# Altium PCB Urukul.PcbDoc (part 2 of 15)
Units mm, origin at the board's own origin, x right, y up, seen from the top; angles counter-clockwise.
Board outline 161.99 x 100 mm, 6 copper layers (L1, L2, L3, L4, P5, L6), stack 1.548 mm thick; 1078 components, 609 nets, 3798 pads, 2552 vias.
Unrouted connection lines stored in the file: 1.
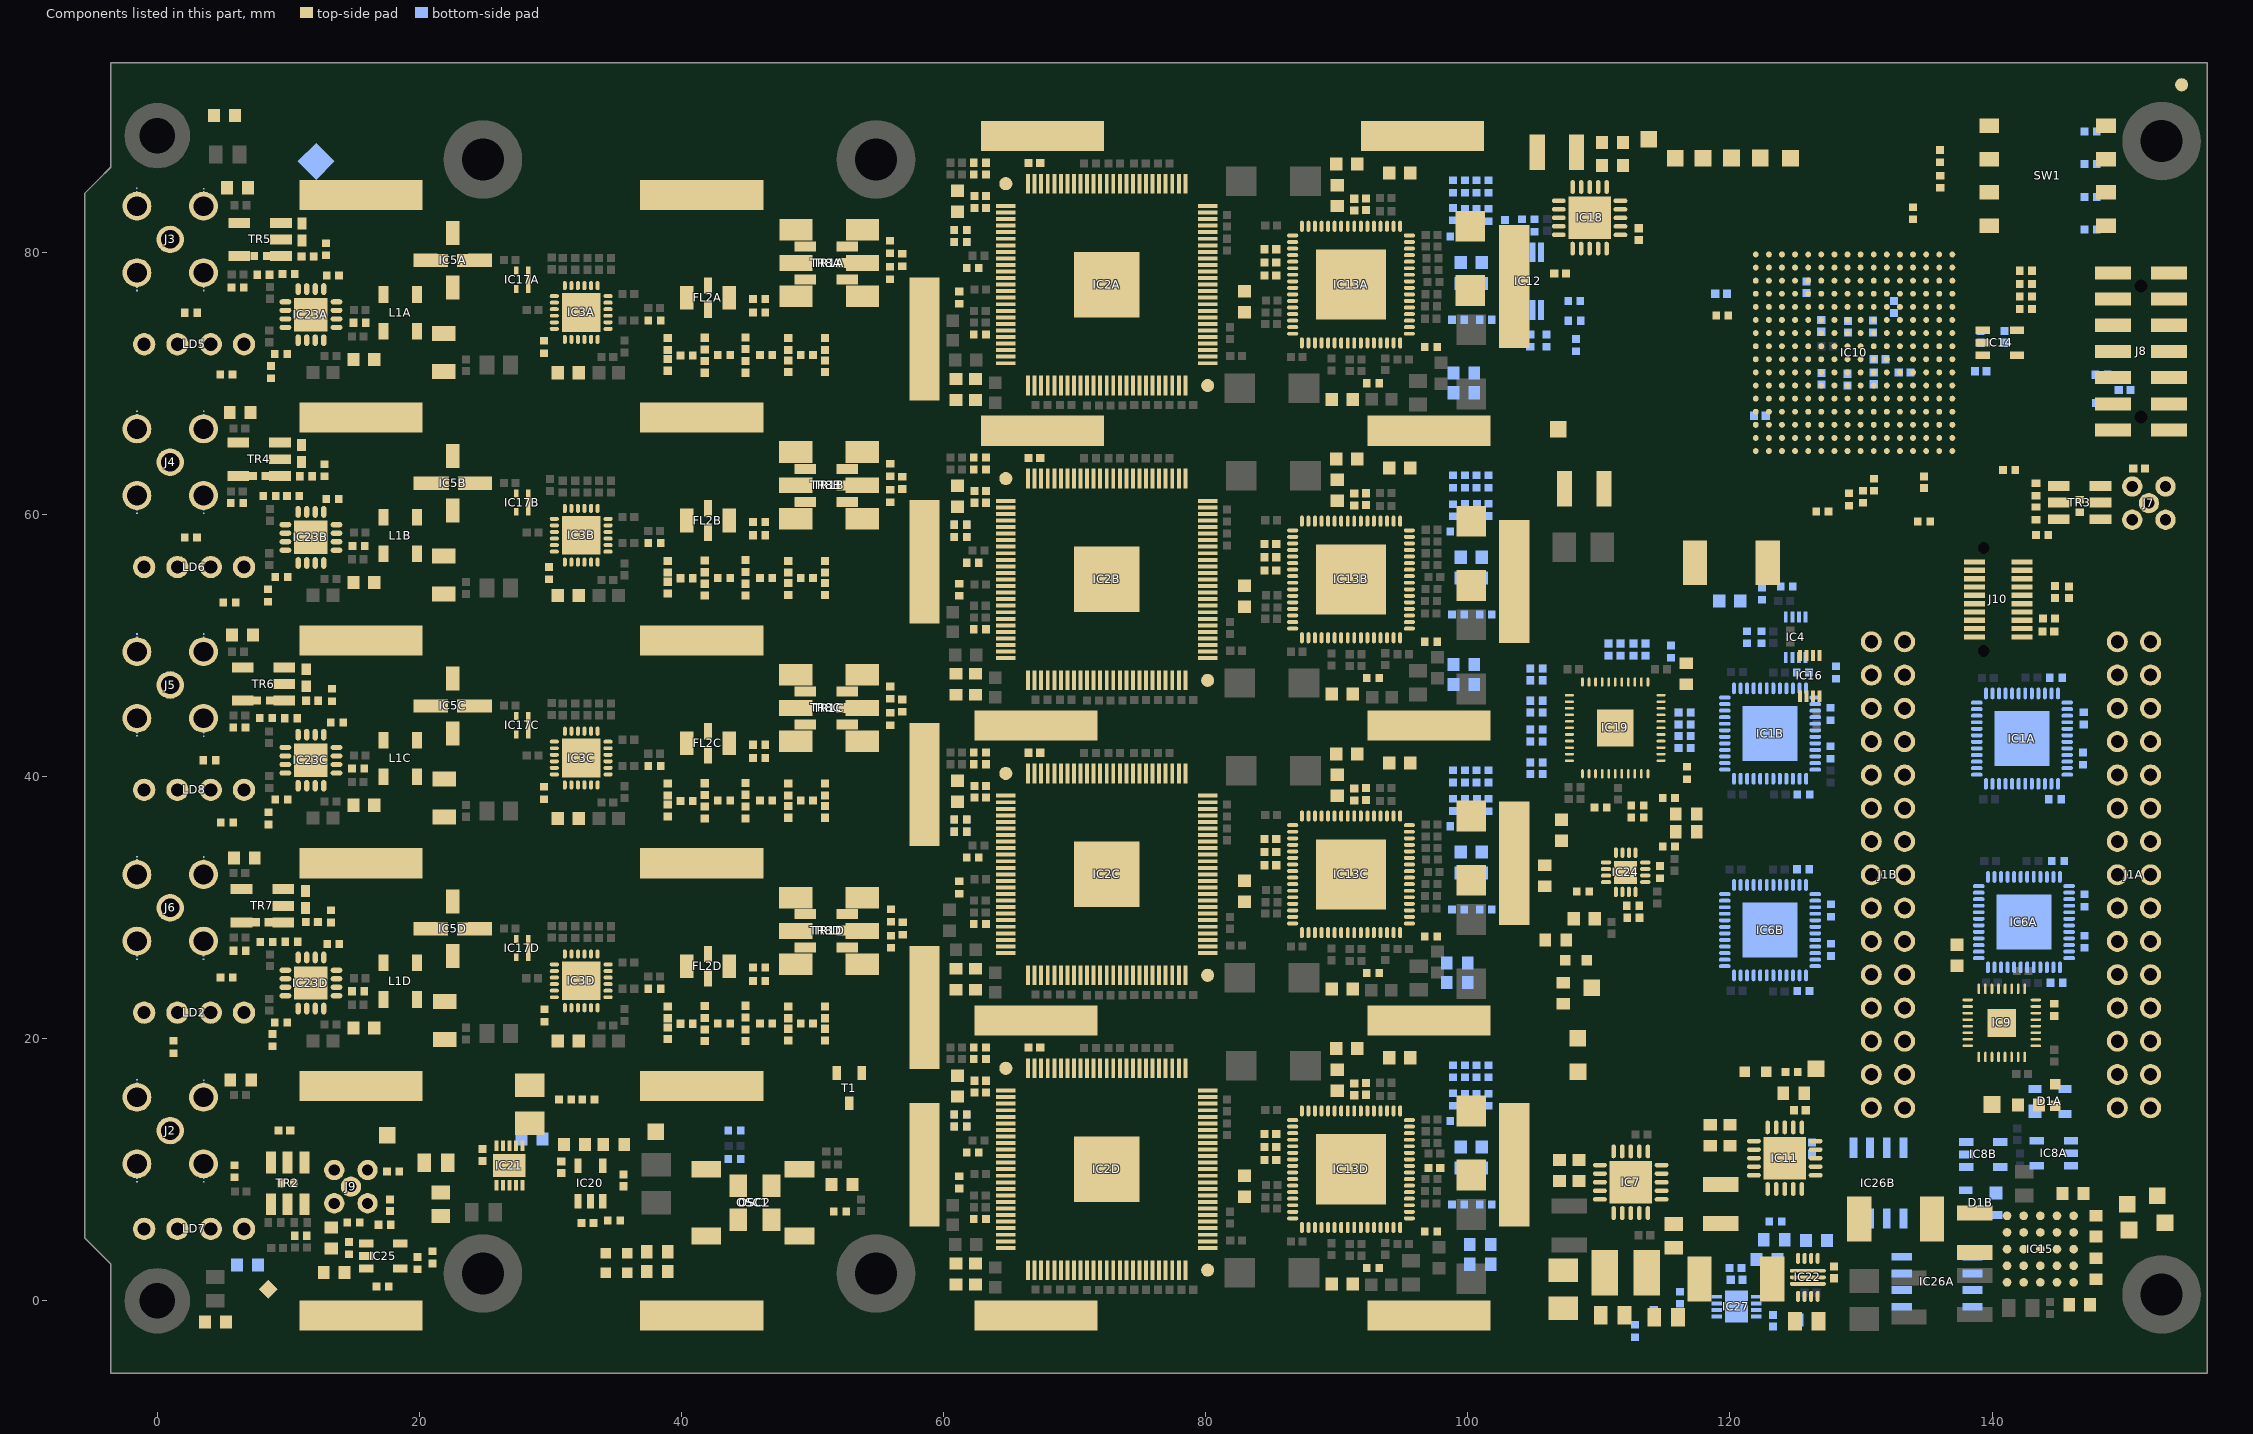
[diagram p6: the components of this part, seen from the top]

## Components (designator, comment, footprint, x,y, rotation, side; value= is the part's Value field where it differs from the comment) (continued)
C148D "100nF" CAPC1005X55N 97.444,10.138 r180 top (schematic designator C148)
C149A "1uF" CAPC1005X55N 91.334,83.638 r270 top (schematic designator C149)
C149B "1uF" CAPC1005X55N 91.334,61.138 r270 top (schematic designator C149)
C149C "1uF" CAPC1005X55N 91.334,38.638 r270 top (schematic designator C149)
C149D "1uF" CAPC1005X55N 91.334,16.138 r270 top (schematic designator C149)
C150A "10nF" CAPC1005X55N 92.235,83.67 r270 top (schematic designator C150)
C150B "10nF" CAPC1005X55N 92.235,61.17 r270 top (schematic designator C150)
C150C "10nF" CAPC1005X55N 92.235,38.67 r270 top (schematic designator C150)
C150D "10nF" CAPC1005X55N 92.235,16.17 r270 top (schematic designator C150)
C151A "1uF" CAPC1005X55N 84.934,79.238 r0 top (schematic designator C151)
C151B "1uF" CAPC1005X55N 84.934,56.738 r0 top (schematic designator C151)
C151C "1uF" CAPC1005X55N 84.934,34.238 r0 top (schematic designator C151)
C151D "1uF" CAPC1005X55N 84.934,11.738 r0 top (schematic designator C151)
C152 "100nF" CAPC1005X55N 122.285,67.538 r0 bottom
C153A "100nF" CAPC1005X55N 84.934,80.238 r0 top (schematic designator C153)
C153B "100nF" CAPC1005X55N 84.934,57.738 r0 top (schematic designator C153)
C153C "100nF" CAPC1005X55N 84.934,35.238 r0 top (schematic designator C153)
C153D "100nF" CAPC1005X55N 84.934,12.738 r0 top (schematic designator C153)
C154A "100nF" CAPC1005X55N 84.934,78.238 r0 top (schematic designator C154)
C154B "100nF" CAPC1005X55N 84.934,55.738 r0 top (schematic designator C154)
C154C "100nF" CAPC1005X55N 84.934,33.238 r0 top (schematic designator C154)
C154D "100nF" CAPC1005X55N 84.934,10.738 r0 top (schematic designator C154)
C155 "22uF" CAPC2012X135N 21.631,7.373 r90 top
C156 "22uF" CAPMP3528X210N 107.294,0.888 r270 top
C157A "100nF" CAPC1005X55N 62.794,83.391 r0 top (schematic designator C157)
C157B "100nF" CAPC1005X55N 62.794,60.891 r0 top (schematic designator C157)
C157C "100nF" CAPC1005X55N 62.794,38.391 r0 top (schematic designator C157)
C157D "100nF" CAPC1005X55N 62.794,15.891 r0 top (schematic designator C157)
C158A "100nF" CAPC1005X55N 62.794,84.291 r0 top (schematic designator C158)
C158B "100nF" CAPC1005X55N 62.794,61.791 r0 top (schematic designator C158)
C158C "100nF" CAPC1005X55N 62.794,39.291 r0 top (schematic designator C158)
C158D "100nF" CAPC1005X55N 62.794,16.791 r0 top (schematic designator C158)
C159A "100nF" CAPC1005X55N 66.919,86.816 r180 top (schematic designator C159)
C159B "100nF" CAPC1005X55N 66.919,64.316 r180 top (schematic designator C159)
C159C "100nF" CAPC1005X55N 66.919,41.816 r180 top (schematic designator C159)
C159D "100nF" CAPC1005X55N 66.919,19.316 r180 top (schematic designator C159)
C160 "1uF" CAPC1005X55N 126.267,11.628 r90 bottom
C161 "47uF" CAPC3225X270N 138.682,5.195 r90 top
C162A "10uF" CAPMP6032X280N 100.194,79.541 r270 top (schematic designator C162)
C162B "10uF" CAPMP6032X280N 100.264,57.038 r270 top (schematic designator C162)
C162C "10uF" CAPMP6032X280N 100.264,34.538 r270 top (schematic designator C162)
C162D "10uF" CAPMP6032X280N 100.264,12.038 r270 top (schematic designator C162)
C163 "47uF" CAPC3225X270N 108.889,61.975 r0 top
C164A "Undefined" CAPC1005X55N 50.944,71.313 r270 top (schematic designator C164)
C164B "Undefined" CAPC1005X55N 50.944,54.313 r270 top (schematic designator C164)
C164C "Undefined" CAPC1005X55N 50.944,37.313 r270 top (schematic designator C164)
C164D "Undefined" CAPC1005X55N 50.944,20.313 r270 top (schematic designator C164)
C165 "1uF" CAPC1005X55N 125.334,14.541 r0 top
C166 "47uF" CAPC3225X270N 119.294,7.388 r90 top
C167 "1uF" CAPC1005X55N 107.044,78.388 r180 top
C168 "1uF" CAPC1005X55N 113.044,81.388 r270 top
C169 "47uF" CAPC3225X270N 106.794,87.638 r0 top
C170 "10nF" CAPC1005X55N 35.574,9.188 r90 top
C171 "1uF" CAPC1005X55N 32.824,5.938 r180 top
C172A "Undefined" CAPC1005X55N 48.144,73.013 r90 top (schematic designator C172)
C172B "Undefined" CAPC1005X55N 48.144,56.013 r90 top (schematic designator C172)
C172C "Undefined" CAPC1005X55N 48.144,39.013 r90 top (schematic designator C172)
C172D "Undefined" CAPC1005X55N 48.144,22.013 r90 top (schematic designator C172)
C173 "100nF" CAPC1005X55N 30.824,10.188 r90 top
C174 "22uF" CAPMP3528X210N 28.424,15.002 r90 top
C175 "100nF" CAPC1005X55N 139.136,70.931 r0 bottom
C176A "Undefined" CAPC1005X55N 44.894,71.263 r270 top (schematic designator C176)
C176B "Undefined" CAPC1005X55N 44.894,54.263 r270 top (schematic designator C176)
C176C "Undefined" CAPC1005X55N 44.894,37.263 r270 top (schematic designator C176)
C176D "Undefined" CAPC1005X55N 44.894,20.263 r270 top (schematic designator C176)
C177 "100nF" CAPC1005X55N 24.817,11.13 r90 top
C178 "100nF" CAPC1005X55N 120.423,2.491 r180 bottom
C179 "22uF" CAPC2012X135N 115.131,-1.247 r0 top
C180A "Undefined" CAPC1005X55N 41.769,73.038 r90 top (schematic designator C180)
C180B "Undefined" CAPC1005X55N 41.769,56.038 r90 top (schematic designator C180)
C180C "Undefined" CAPC1005X55N 41.769,39.038 r90 top (schematic designator C180)
C180D "Undefined" CAPC1005X55N 41.769,22.038 r90 top (schematic designator C180)
C181 "100nF" CAPC1005X55N 127.943,2.173 r270 top
C182 "22uF" CAPC2012X135N 125.858,-1.562 r180 top
C183 "22uF" CAPC2012X135N 111.044,-1.112 r0 top
C184 "100nF" CAPC1005X55N 128.97,70.291 r270 bottom
C185 "100nF" CAPC1005X55N 139.128,73.553 r90 bottom
C186 "100nF" CAPC1005X55N 131.42,71.841 r0 bottom
C187 "100nF" CAPC1005X55N 126.974,70.359 r90 bottom
C188 "100nF" CAPC1005X55N 130.97,70.391 r270 bottom
C189 "100nF" CAPC1005X55N 144.794,54.088 r270 top
C190 "100nF" CAPC1005X55N 151.221,63.513 r180 top
C191 "0.5pF" CAPC1005X50N 143.34,61.911 r90 top
C192 "100nF" CAPC1005X55N 130.902,74.338 r90 bottom
C193 "100nF" CAPC1005X55N 126.97,74.391 r270 bottom
C194 "100nF" CAPC1005X55N 145.869,54.063 r270 top
C195 "0.5pF" CAPC1005X50N 143.34,60.082 r90 top
C196 "100nF" CAPC1005X55N 9.694,12.988 r0 top
C197 "1uF" CAPC1005X55N 129.006,74.327 r90 bottom
C198 "1uF" CAPC1005X55N 125.831,77.337 r270 bottom
C199 "100nF" CAPC1005X55N 133.328,70.84 r0 bottom
C200 "100nF" CAPC1005X55N 132.515,75.834 r90 bottom
C201 "100nF" CAPC1005X55N 140.953,73.553 r90 bottom
C202A "Undefined" CAPC1005X55N 38.944,71.413 r270 top (schematic designator C202)
C202B "Undefined" CAPC1005X55N 38.944,54.413 r270 top (schematic designator C202)
C202C "Undefined" CAPC1005X55N 38.944,37.413 r270 top (schematic designator C202)
C202D "Undefined" CAPC1005X55N 38.944,20.413 r270 top (schematic designator C202)
C203A "Undefined" CAPC1005X55N 50.944,73.013 r270 top (schematic designator C203)
C203B "Undefined" CAPC1005X55N 50.944,56.013 r270 top (schematic designator C203)
C203C "Undefined" CAPC1005X55N 50.944,39.013 r270 top (schematic designator C203)
C203D "Undefined" CAPC1005X55N 50.944,22.013 r270 top (schematic designator C203)
C204A "Undefined" CAPC1005X55N 48.144,71.313 r90 top (schematic designator C204)
C204B "Undefined" CAPC1005X55N 48.144,54.313 r90 top (schematic designator C204)
C204C "Undefined" CAPC1005X55N 48.144,37.313 r90 top (schematic designator C204)
C204D "Undefined" CAPC1005X55N 48.144,20.313 r90 top (schematic designator C204)
C205A "Undefined" CAPC1005X55N 44.894,73.063 r270 top (schematic designator C205)
C205B "Undefined" CAPC1005X55N 44.894,56.063 r270 top (schematic designator C205)
C205C "Undefined" CAPC1005X55N 44.894,39.063 r270 top (schematic designator C205)
C205D "Undefined" CAPC1005X55N 44.894,22.063 r270 top (schematic designator C205)
C206A "Undefined" CAPC1005X55N 41.769,71.263 r90 top (schematic designator C206)
C206B "Undefined" CAPC1005X55N 41.769,54.263 r90 top (schematic designator C206)
C206C "Undefined" CAPC1005X55N 41.769,37.263 r90 top (schematic designator C206)
C206D "Undefined" CAPC1005X55N 41.769,20.263 r90 top (schematic designator C206)
C207A "Undefined" CAPC1005X55N 38.944,73.013 r270 top (schematic designator C207)
C207B "Undefined" CAPC1005X55N 38.944,56.013 r270 top (schematic designator C207)
C207C "Undefined" CAPC1005X55N 38.944,39.013 r270 top (schematic designator C207)
C207D "Undefined" CAPC1005X55N 38.944,22.013 r270 top (schematic designator C207)
C208 "100nF" CAPC1005X55N 134.819,62.458 r90 top
C209 "100nF" CAPC1005X55N 119.331,76.84 r0 bottom
C210 "100nF" CAPC1005X55N 150.119,69.506 r180 bottom
C211 "22uF" CAPC2012X135N 115.704,4.953 r270 top
C212 "100nF" CAPC1005X55N 17.744,7.288 r90 top
C213 "100nF" CAPC1005X55N 144.344,52.063 r180 top
C214 "100nF" CAPC1005X55N 144.294,51.063 r180 top
C215 "22uF" CAPC2012X135N 21.269,10.538 r0 top
C216 "2.2uF" CAPC1005X55N 117.54,0.523 r180 bottom
C217 "100nF" CAPC1005X55N 120.511,1.603 r180 bottom
C218 "100nF" CAPC1005X55N 123.291,-1.522 r90 bottom
CLIP1 "S1411-46R" CLIP_HOLLAND-SHIELDING_LC 103.544,77.388 r270 top
CLIP2 "S1411-46R" CLIP_HOLLAND-SHIELDING_LC 58.544,10.388 r270 top
CLIP3 "S1411-46R" CLIP_HOLLAND-SHIELDING_LC 67.544,88.888 r180 top
CLIP4 "S1411-46R" CLIP_HOLLAND-SHIELDING_LC 97.044,21.388 r180 top
CLIP5 "S1411-46R" CLIP_HOLLAND-SHIELDING_LC 58.544,73.388 r270 top
CLIP6 "S1411-46R" CLIP_HOLLAND-SHIELDING_LC 96.544,88.888 r180 top
CLIP7 "S1411-46R" CLIP_HOLLAND-SHIELDING_LC 41.544,84.388 r180 top
CLIP8 "S1411-46R" CLIP_HOLLAND-SHIELDING_LC 41.544,16.388 r180 top
CLIP9 "S1411-46R" CLIP_HOLLAND-SHIELDING_LC 97.044,-1.112 r180 top
CLIP10 "S1411-46R" CLIP_HOLLAND-SHIELDING_LC 58.544,56.388 r270 top
CLIP11 "S1411-46R" CLIP_HOLLAND-SHIELDING_LC 67.044,43.888 r180 top
CLIP12 "S1411-46R" CLIP_HOLLAND-SHIELDING_LC 97.044,66.388 r180 top
CLIP13 "S1411-46R" CLIP_HOLLAND-SHIELDING_LC 97.044,43.888 r180 top
CLIP14 "S1411-46R" CLIP_HOLLAND-SHIELDING_LC 67.044,21.388 r180 top
CLIP15 "S1411-46R" CLIP_HOLLAND-SHIELDING_LC 67.544,66.388 r180 top
CLIP16 "S1411-46R" CLIP_HOLLAND-SHIELDING_LC 15.544,33.388 r180 top
CLIP17 "S1411-46R" CLIP_HOLLAND-SHIELDING_LC 41.544,33.388 r180 top
CLIP18 "S1411-46R" CLIP_HOLLAND-SHIELDING_LC 58.544,22.388 r270 top
CLIP19 "S1411-46R" CLIP_HOLLAND-SHIELDING_LC 15.544,16.388 r180 top
CLIP20 "S1411-46R" CLIP_HOLLAND-SHIELDING_LC 67.044,-1.112 r180 top
CLIP21 "S1411-46R" CLIP_HOLLAND-SHIELDING_LC 15.544,67.388 r180 top
CLIP22 "S1411-46R" CLIP_HOLLAND-SHIELDING_LC 41.544,67.388 r180 top
CLIP23 "S1411-46R" CLIP_HOLLAND-SHIELDING_LC 15.544,84.388 r180 top
CLIP24 "S1411-46R" CLIP_HOLLAND-SHIELDING_LC 15.544,50.388 r180 top
CLIP25 "S1411-46R" CLIP_HOLLAND-SHIELDING_LC 41.544,50.388 r180 top
CLIP26 "S1411-46R" CLIP_HOLLAND-SHIELDING_LC 58.544,39.388 r270 top
CLIP27 "S1411-46R" CLIP_HOLLAND-SHIELDING_LC 103.544,10.388 r90 top
CLIP28 "S1411-46R" CLIP_HOLLAND-SHIELDING_LC 103.544,33.388 r90 top
CLIP29 "S1411-46R" CLIP_HOLLAND-SHIELDING_LC 103.544,54.888 r90 top
CLIP30 "S1411-46R" CLIP_HOLLAND-SHIELDING_LC 15.544,-1.112 r180 top
CLIP31 "S1411-46R" CLIP_HOLLAND-SHIELDING_LC 41.544,-1.112 r180 top
D1A "PRTR5V0U2X" SOT190P230X110-4N 144.419,15.213 r0 bottom (schematic designator D1)
D1B "PRTR5V0U2X" SOT190P230X110-4N 139.144,7.488 r180 bottom (schematic designator D1)
D2A "0402ESDA-MLP" EATON_0402ESDA-MLP 11.044,81.563 r270 top (schematic designator D2)
D2B "0402ESDA-MLP" EATON_0402ESDA-MLP 10.999,64.654 r270 top (schematic designator D2)
D2C "0402ESDA-MLP" EATON_0402ESDA-MLP 11.369,47.541 r270 top (schematic designator D2)
D2D "0402ESDA-MLP" EATON_0402ESDA-MLP 11.319,30.613 r270 top (schematic designator D2)
FL2A "DC to 320MHz" FIL_MINI-CIRCUITS_FV1206 42.019,76.538 r180 top (schematic designator FL2)
FL2B "DC to 320MHz" FIL_MINI-CIRCUITS_FV1206 42.019,59.538 r180 top (schematic designator FL2)
FL2C "DC to 320MHz" FIL_MINI-CIRCUITS_FV1206 42.019,42.538 r180 top (schematic designator FL2)
FL2D "DC to 320MHz" FIL_MINI-CIRCUITS_FV1206 42.019,25.538 r180 top (schematic designator FL2)
FTG1 "Use only in PCB" FIDUCIAL_TOP_C100-200 154.463,92.788 r90 top
FTG2 "Use only in PCB" FIDUCIAL_TOP_S100-200 8.461,0.884 r180 top
FTG3 "Use only in PCB" FIDUCIAL_TOP_S200-400 12.119,86.94 r180 bottom
FTG4 "Use only in PCB" FIDUCIAL_TOP_S100-200 8.461,0.884 r90 bottom
IC1A "SN65MLVD040RGZT" QFN50P700X700X100-49N-S420 142.281,42.896 r180 bottom (schematic designator IC1)
IC1B "SN65MLVD040RGZT" QFN50P700X700X100-49N-S420 123.058,43.282 r180 bottom (schematic designator IC1)
IC2A "AD9910BSVZ" QFP50P1600X1600X120-101N-S500 72.444,77.541 r90 top (schematic designator IC2)
IC2B "AD9910BSVZ" QFP50P1600X1600X120-101N-S500 72.444,55.041 r90 top (schematic designator IC2)
IC2C "AD9910BSVZ" QFP50P1600X1600X120-101N-S500 72.444,32.541 r90 top (schematic designator IC2)
IC2D "AD9910BSVZ" QFP50P1600X1600X120-101N-S500 72.444,10.041 r90 top (schematic designator IC2)
IC3A "HMC542BLP4E" QFN50P400X400X100-25N-S295 32.344,75.413 r180 top (schematic designator IC3)
IC3B "HMC542BLP4E" QFN50P400X400X100-25N-S295 32.344,58.413 r180 top (schematic designator IC3)
IC3C "HMC542BLP4E" QFN50P400X400X100-25N-S295 32.344,41.413 r180 top (schematic designator IC3)
IC3D "HMC542BLP4E" QFN50P400X400X100-25N-S295 32.344,24.413 r180 top (schematic designator IC3)
IC4 "FIN1101K8X" SOP50P310X90-8N 125.008,50.632 r270 bottom
IC5A "ERA-3SM+" MINI-CIRCUITS_WW107 22.544,79.388 r180 top (schematic designator IC5)
IC5B "ERA-3SM+" MINI-CIRCUITS_WW107 22.544,62.388 r180 top (schematic designator IC5)
IC5C "ERA-3SM+" MINI-CIRCUITS_WW107 22.544,45.388 r180 top locked (schematic designator IC5)
IC5D "ERA-3SM+" MINI-CIRCUITS_WW107 22.544,28.388 r180 top (schematic designator IC5)
IC6A "SN65MLVD040RGZT" QFN50P700X700X100-49N-S420 142.431,28.896 r180 bottom (schematic designator IC6)
IC6B "SN65MLVD040RGZT" QFN50P700X700X100-49N-S420 123.058,28.282 r180 bottom (schematic designator IC6)
IC7 "TPS74901RGWT" QFN65P500X500X100-21N-S325 112.431,9.047 r90 top
IC8A "24AA02E48T-I/OT" SOT95P280X145-5N 144.723,11.258 r180 bottom (schematic designator IC8)
IC8B "24AA02E48T-I/OT" SOT95P280X145-5N 139.322,11.171 r0 bottom (schematic designator IC8)
IC9 "Si53304-B-GM" SLAB-QFN-32-2150x2150TP_M 140.741,21.205 r90 top
IC10 "XC2C256-6FTG256C" FTG256 129.47,72.341 r0 top locked
IC11 "TPS74901RGWT" QFN65P500X500X100-21N-S325 124.181,10.88 r90 top locked
IC12 "LM75AIMM/NOPB" SOP65P490X109-8N 104.613,77.805 r90 bottom
IC13A "AD9912ABCPZ" QFN50P900X900X100-65N-S536 91.084,77.541 r0 top (schematic designator IC13)
IC13B "AD9912ABCPZ" QFN50P900X900X100-65N-S536 91.084,55.041 r0 top (schematic designator IC13)
IC13C "AD9912ABCPZ" QFN50P900X900X100-65N-S536 91.084,32.541 r0 top (schematic designator IC13)
IC13D "AD9912ABCPZ" QFN50P900X900X100-65N-S536 91.084,10.041 r0 top (schematic designator IC13)
IC14 "LP3990MF-1.8/NOPB" SOT95P284X122-5N 140.603,73.103 r0 top
IC15 "LTM4622AEV#PBF" LGA25C127P5X5_625X625X190 143.682,3.945 r0 top locked
IC16 "FIN1101K8X" SOP50P310X90-8N 126.098,47.685 r270 top
IC17A "PAT1220-C-9DB-T5" SUSUMU_PAT1220 27.844,77.913 r90 top (schematic designator IC17)
IC17B "PAT1220-C-9DB-T5" SUSUMU_PAT1220 27.844,60.913 r90 top (schematic designator IC17)
IC17C "PAT1220-C-9DB-T5" SUSUMU_PAT1220 27.844,43.913 r90 top (schematic designator IC17)
IC17D "PAT1220-C-9DB-T5" SUSUMU_PAT1220 27.844,26.913 r90 top (schematic designator IC17)
IC18 "TPS74901RGWT" QFN65P500X500X100-21N-S325 109.294,82.638 r0 top
IC19 "Si53312-B-GM" SLAB-QFN-44-2800x2800TP_N 111.244,43.713 r0 top
IC20 "LT1761ES5-BYP#TRMPBF" SOT95P280X100-5N 33.044,8.96 r90 top
IC21 "LT3045EDD#PBF" SON50P300X300X80-11N-R175X248 26.869,10.315 r90 top
IC22 "TPS62148RGX" TEXAS_RGX0011A 125.944,1.791 r180 top
IC23A "HMC349ALP4CE" QFN65P400X400X100-17N-S255 11.723,75.249 r180 top (schematic designator IC23)
IC23B "HMC349ALP4CE" QFN65P400X400X100-17N-S255 11.723,58.249 r180 top locked (schematic designator IC23)
IC23C "HMC349ALP4CE" QFN65P400X400X100-17N-S255 11.723,41.249 r180 top (schematic designator IC23)
IC23D "HMC349ALP4CE" QFN65P400X400X100-17N-S255 11.723,24.249 r180 top (schematic designator IC23)
IC24 "Si53340-B-GM" QFN50P300X300X90-17N-S175 112.043,32.696 r90 top
IC25 "LMV321ILT" SOT95P280X145-5N 17.244,3.413 r0 top
IC26A "24AA02E48-I/SN" SOIC127P600X175-8N 135.811,1.454 r180 bottom (schematic designator IC26)
IC26B "24AA02E48-I/SN" SOIC127P600X175-8N 131.33,8.983 r90 bottom (schematic designator IC26)
IC27 "LTC3624EDD-2" SON50P300X300X80-9N-R175X248 120.498,-0.441 r180 bottom
J1A "" 3M_N2530-6002RB 150.828,32.507 r270 top (schematic designator J1)
J1B "" 3M_N2530-6002RB 132.058,32.506 r270 top (schematic designator J1)
J2 "SMA" DELOCK_65848 0.984,12.988 r180 top locked
J3 "SMA" DELOCK_65848 0.984,80.988 r180 top locked
J4 "SMA" DELOCK_65848 0.984,63.988 r180 top locked
J5 "SMA" DELOCK_65848 0.984,46.988 r180 top locked
J6 "SMA" DELOCK_65848 0.984,29.988 r180 top locked
J7 "MMCX" SAMTEC_MMCX-J-P-H-ST-TH1 151.969,60.863 r180 top
J8 "Milli-Grid™" MOLEX_87832-1420 151.369,72.44 r90 top
J9 "MMCX" SAMTEC_MMCX-J-P-H-ST-TH1 14.774,8.708 r0 top
J10 "" SAMTEC_LSS-110-01-L-DV-A 140.469,53.513 r90 top locked
L1A "0.5uH@200mA" IND_MINI-CIRCUITS_GU1604 18.544,75.388 r180 top (schematic designator L1)
L1B "0.5uH@200mA" IND_MINI-CIRCUITS_GU1604 18.544,58.388 r180 top (schematic designator L1)
L1C "0.5uH@200mA" IND_MINI-CIRCUITS_GU1604 18.544,41.388 r180 top (schematic designator L1)
L1D "0.5uH@200mA" IND_MINI-CIRCUITS_GU1604 18.544,24.388 r180 top (schematic designator L1)
L2 "1.5uH" IND_TDK_SPM6530 132.634,6.24 r180 top
L3 "1.5uH" IND_TDK_SPM6530 120.109,56.316 r180 top
L4 "1.5uH" IND_TDK_SPM6530 120.452,1.663 r180 top
L5 "10uH" IND_MURATA-PS_8400 112.044,2.138 r180 top
L6A "390R@100MHz" INDC1608X95N 15.769,71.813 r0 top (schematic designator L6)
L6B "390R@100MHz" INDC1608X95N 15.769,54.813 r0 top (schematic designator L6)
L6C "390R@100MHz" INDC1608X95N 15.769,37.813 r0 top (schematic designator L6)
L6D "390R@100MHz" INDC1608X95N 15.769,20.813 r0 top (schematic designator L6)
L7A "390R@100MHz" INDC1608X95N 31.344,70.813 r0 top (schematic designator L7)
L7B "390R@100MHz" INDC1608X95N 31.344,53.813 r0 top (schematic designator L7)
L7C "390R@100MHz" INDC1608X95N 31.344,36.813 r0 top (schematic designator L7)
L7D "390R@100MHz" INDC1608X95N 31.344,19.813 r0 top (schematic designator L7)
L8 "120R@100MHz" INDC1608X95N 119.995,53.391 r180 bottom
L9 "120R@100MHz" INDC1608X95N 52.244,8.888 r0 top
L10 "120R@100MHz" INDC1608X95N 108.893,29.154 r180 top
L13 "120R@100MHz" INDC1608X95N 137.316,26.36 r90 top
L14 "120R@100MHz" INDC1608X95N 107.137,35.915 r270 top
L15A "120R@100MHz" INDC1608X95N 61.044,83.888 r270 top (schematic designator L15)
L15B "120R@100MHz" INDC1608X95N 61.044,61.388 r270 top (schematic designator L15)
L15C "120R@100MHz" INDC1608X95N 61.044,38.888 r270 top (schematic designator L15)
L15D "120R@100MHz" INDC1608X95N 61.044,16.388 r270 top (schematic designator L15)
L16A "120R@100MHz" INDC1608X95N 90.419,68.788 r180 top (schematic designator L16)
L16B "120R@100MHz" INDC1608X95N 90.419,46.288 r180 top (schematic designator L16)
L16C "120R@100MHz" INDC1608X95N 90.419,23.788 r180 top (schematic designator L16)
L16D "120R@100MHz" INDC1608X95N 90.419,1.288 r180 top (schematic designator L16)
L17A "120R@100MHz" INDC1608X95N 82.956,76.245 r270 top (schematic designator L17)
L17B "120R@100MHz" INDC1608X95N 82.956,53.745 r270 top (schematic designator L17)
L17C "120R@100MHz" INDC1608X95N 82.956,31.245 r270 top (schematic designator L17)
L17D "120R@100MHz" INDC1608X95N 82.956,8.745 r270 top (schematic designator L17)
L18A "120R@100MHz" INDC1608X95N 94.792,86.05 r0 top (schematic designator L18)
L18B "120R@100MHz" INDC1608X95N 94.792,63.55 r0 top (schematic designator L18)
L18C "120R@100MHz" INDC1608X95N 94.792,41.05 r0 top (schematic designator L18)
L18D "120R@100MHz" INDC1608X95N 94.792,18.55 r0 top (schematic designator L18)
L19A "120R@100MHz" INDC1608X95N 100.264,79.238 r0 bottom (schematic designator L19)
L19B "120R@100MHz" INDC1608X95N 100.264,56.738 r0 bottom (schematic designator L19)
L19C "120R@100MHz" INDC1608X95N 100.264,34.238 r0 bottom (schematic designator L19)
L19D "120R@100MHz" INDC1608X95N 100.264,11.738 r0 bottom (schematic designator L19)
L20A "120R@100MHz" INDC1608X95N 100.264,77.638 r0 bottom (schematic designator L20)
L20B "120R@100MHz" INDC1608X95N 100.264,55.138 r0 bottom (schematic designator L20)
L20C "120R@100MHz" INDC1608X95N 100.264,32.638 r0 bottom (schematic designator L20)
L20D "120R@100MHz" INDC1608X95N 100.264,10.138 r0 bottom (schematic designator L20)
L21A "120R@100MHz" INDC1608X95N 90.034,84.338 r90 top (schematic designator L21)
L21B "120R@100MHz" INDC1608X95N 90.034,61.838 r90 top (schematic designator L21)
L21C "120R@100MHz" INDC1608X95N 90.034,39.338 r90 top (schematic designator L21)
L21D "120R@100MHz" INDC1608X95N 90.034,16.838 r90 top (schematic designator L21)
L22A "120R@100MHz" INDC1608X95N 90.764,86.738 r0 top (schematic designator L22)
L22B "120R@100MHz" INDC1608X95N 90.764,64.238 r0 top (schematic designator L22)
L22C "120R@100MHz" INDC1608X95N 90.764,41.738 r0 top (schematic designator L22)
L22D "120R@100MHz" INDC1608X95N 90.764,19.238 r0 top (schematic designator L22)
LD1 "Green" LED_KINGBRIGHT_KPH-1608CGCKr 35.044,2.138 r0 top
LD2 "Red/Green" LED_DIALIGHT_571-0112F -1.006,21.988 r0 top locked
LD3 "Green" LED_KINGBRIGHT_KPH-1608CGCKr 121.949,17.478 r0 top
LD4 "Green" LED_KINGBRIGHT_KPH-1608CGCKr 108.244,25.988 r180 top
LD5 "Red/Green" LED_DIALIGHT_571-0112F -1.006,72.988 r0 top locked
LD6 "Red/Green" LED_DIALIGHT_571-0112F -1.006,55.988 r0 top locked
LD7 "Red/Green" LED_DIALIGHT_571-0112F -1.006,5.488 r0 top locked
LD8 "Red/Green" LED_DIALIGHT_571-0112F -1.006,38.988 r0 top locked
LD9 "Green" LED_KINGBRIGHT_KPH-1608CGCKr 35.044,3.638 r0 top
LD10 "Green" LED_KINGBRIGHT_KPH-1608CGCKr 144.832,15.704 r270 top
NT1 "Net Tie" "Net Tie" 3.531,84.607 r90 bottom net-tie
NT2 "Net Tie" "Net Tie" 3.531,77.343 r270 bottom net-tie
NT3 "Net Tie" "Net Tie" -1.575,84.633 r90 bottom net-tie
NT4 "Net Tie" "Net Tie" -1.549,77.343 r270 bottom net-tie
NT5 "Net Tie" "Net Tie" 3.531,60.35 r270 bottom net-tie
NT6 "Net Tie" "Net Tie" -1.549,60.35 r270 bottom net-tie
NT7 "Net Tie" "Net Tie" 3.531,67.615 r90 bottom net-tie
NT8 "Net Tie" "Net Tie" -1.549,67.615 r90 bottom net-tie
NT9 "Net Tie" "Net Tie" -1.549,43.358 r270 bottom net-tie
NT10 "Net Tie" "Net Tie" 3.531,50.622 r90 bottom net-tie
NT11 "Net Tie" "Net Tie" 3.531,43.332 r270 bottom net-tie
NT12 "Net Tie" "Net Tie" -1.549,50.622 r90 bottom net-tie
NT13 "Net Tie" "Net Tie" 3.524,26.317 r270 bottom net-tie
NT14 "Net Tie" "Net Tie" -1.549,33.63 r90 bottom net-tie
NT15 "Net Tie" "Net Tie" 3.531,33.604 r90 bottom net-tie
NT16 "Net Tie" "Net Tie" -1.556,26.317 r270 bottom net-tie
NT17 "Net Tie" "Net Tie" -1.549,16.612 r90 bottom net-tie
NT18 "Net Tie" "Net Tie" 3.531,9.347 r270 bottom net-tie
NT19 "Net Tie" "Net Tie" -1.549,9.347 r270 bottom net-tie
NT20 "Net Tie" "Net Tie" 3.531,16.586 r90 bottom net-tie
OSC1 "100MHz" OSC_CRYSTEK_CCHD-950 45.444,7.488 r0 top
OSC2 "510CCA100M000BAG" 510CBA49M1520BAG 45.191,7.488 r270 top
R1 "10k" RESC1005X40N 134.804,59.477 r180 top
R2A "0" RESC1005X40N 10.019,78.359 r0 top (schematic designator R2)
R2B "0" RESC1005X40N 10.369,61.413 r0 top (schematic designator R2)
R2C "0" RESC1005X40N 10.194,44.448 r0 top (schematic designator R2)
R2D "0" RESC1005X40N 10.244,27.396 r0 top (schematic designator R2)
R3A "Undefined" RESC1005X40N 8.094,78.297 r0 top (schematic designator R3)
R3B "Undefined" RESC1005X40N 8.555,61.413 r0 top (schematic designator R3)
R3C "Undefined" RESC1005X40N 8.289,44.456 r0 top (schematic designator R3)
R3D "Undefined" RESC1005X40N 8.325,27.381 r0 top (schematic designator R3)
R4A "Undefined" RESC1005X40N 12.881,80.238 r270 top (schematic designator R4)
R4B "Undefined" RESC1005X40N 12.744,63.373 r270 top (schematic designator R4)
R4C "Undefined" RESC1005X40N 13.323,46.218 r270 top (schematic designator R4)
R4D "Undefined" RESC1005X40N 13.244,29.338 r270 top (schematic designator R4)
R5 "1k2" RESC1608X55N 38.149,2.243 r0 top
R6 "100k" RESC1005X40N 5.894,9.888 r270 top
R7A "100" RESC1005X40N 144.881,47.546 r0 bottom (schematic designator R7)
R7B "100" RESC1005X40N 125.558,47.932 r0 bottom (schematic designator R7)
R8A "100" RESC1005X40N 56.844,79.413 r90 top (schematic designator R8)
R8B "100" RESC1005X40N 56.844,62.413 r90 top (schematic designator R8)
R8C "100" RESC1005X40N 56.844,45.413 r90 top (schematic designator R8)
R8D "100" RESC1005X40N 56.884,28.411 r90 top (schematic designator R8)
R9A "100" RESC1005X40N 146.993,44.445 r270 bottom (schematic designator R9)
R9B "100" RESC1005X40N 127.683,44.782 r270 bottom (schematic designator R9)
R10A "100" RESC1005X40N 61.194,76.541 r270 top (schematic designator R10)
R10B "100" RESC1005X40N 61.194,54.258 r270 top (schematic designator R10)
R10C "100" RESC1005X40N 61.194,31.541 r270 top (schematic designator R10)
R10D "100" RESC1005X40N 61.194,9.041 r270 top (schematic designator R10)
R11A "100" RESC1005X40N 146.931,41.371 r270 bottom (schematic designator R11)
R11B "100" RESC1005X40N 127.658,41.832 r270 bottom (schematic designator R11)
R12A "100" RESC1005X40N 92.769,70.013 r0 top (schematic designator R12)
R12B "100" RESC1005X40N 92.769,47.513 r0 top (schematic designator R12)
R12C "100" RESC1005X40N 92.769,25.013 r0 top (schematic designator R12)
R12D "100" RESC1005X40N 92.769,2.513 r0 top (schematic designator R12)
R13A "100" RESC1005X40N 144.806,38.271 r180 bottom (schematic designator R13)
R13B "100" RESC1005X40N 125.608,38.632 r180 bottom (schematic designator R13)
R14 "0" RESC1608X55N 6.372,16.835 r180 top
R15A "10k" RESC1005X35N 99.119,81.213 r0 bottom (schematic designator R15)
R15B "10k" RESC1005X35N 99.119,58.713 r0 bottom (schematic designator R15)
R15C "10k" RESC1005X35N 99.119,36.213 r0 bottom (schematic designator R15)
R15D "10k" RESC1005X35N 99.119,13.713 r0 bottom (schematic designator R15)
R16A "100" RESC1005X40N 145.031,33.546 r0 bottom (schematic designator R16)
R16B "100" RESC1005X40N 125.583,32.932 r0 bottom (schematic designator R16)
R17 "100" RESC1005X40N 110.131,37.638 r0 top
R18A "100" RESC1005X40N 8.674,70.858 r90 top (schematic designator R18)
R18B "100" RESC1005X40N 8.451,53.813 r90 top (schematic designator R18)
R18C "100" RESC1005X40N 8.471,36.813 r90 top (schematic designator R18)
R18D "100" RESC1005X40N 8.785,19.888 r90 top (schematic designator R18)
R19A "100" RESC1005X40N 9.444,72.238 r180 top (schematic designator R19)
R19B "100" RESC1005X40N 9.474,55.238 r180 top (schematic designator R19)
R19C "100" RESC1005X40N 9.474,38.238 r180 top (schematic designator R19)
R19D "100" RESC1005X40N 9.444,21.238 r180 top (schematic designator R19)
R20A "4k7" RESC1005X40N 15.443,74.625 r180 top (schematic designator R20)
R20B "4k7" RESC1005X40N 15.367,57.607 r180 top (schematic designator R20)
R20C "4k7" RESC1005X40N 15.323,40.619 r180 top (schematic designator R20)
R20D "4k7" RESC1005X40N 15.323,23.619 r180 top (schematic designator R20)
R21A "100" RESC1005X40N 147.056,30.546 r270 bottom (schematic designator R21)
R21B "100" RESC1005X40N 127.708,29.782 r270 bottom (schematic designator R21)
R22 "100" RESC1005X40N 112.944,36.888 r0 top
R23 "4k7" RESC1608X55N 108.494,9.938 r270 top
R24A "100" RESC1005X40N 147.056,27.396 r270 bottom (schematic designator R24)
R24B "100" RESC1005X40N 127.708,26.782 r270 bottom (schematic designator R24)
R25 "470" RESC1005X40N 1.234,19.363 r90 top
R26 "470" RESC1005X40N 5.294,24.663 r0 top
R27 "470" RESC1005X40N 2.575,75.388 r180 top
R28 "470" RESC1005X40N 5.265,70.688 r0 top
R29 "470" RESC1005X40N 2.561,58.249 r180 top
R30 "470" RESC1005X40N 5.514,53.288 r0 top
R31 "1k" RESC1005X40N 121.308,50.632 r90 bottom
R32 "100" RESC1005X40N 122.408,50.632 r270 bottom
R33 "10k" RESC1005X40N 124.708,17.47 r0 top
R34 "200" RESC1005X40N 110.744,49.688 r270 bottom
R35A "100" RESC1005X40N 144.931,24.271 r180 bottom (schematic designator R35)
R35B "100" RESC1005X40N 125.6,23.627 r180 bottom (schematic designator R35)
R36 "1k" RESC1005X40N 122.458,53.957 r270 bottom
R37 "200" RESC1005X40N 105.244,41.088 r0 bottom
R38A "49R9" RESC1005X40N 55.919,78.424 r90 top (schematic designator R38)
R38B "49R9" RESC1005X40N 55.931,61.417 r90 top (schematic designator R38)
R38C "49R9" RESC1005X40N 55.931,44.399 r90 top (schematic designator R38)
R38D "49R9" RESC1005X40N 55.969,27.395 r90 top (schematic designator R38)
R39 "1k" RESC1005X40N 124.333,54.507 r180 bottom
R40A "200" RESC1005X40N 62.764,85.938 r0 top (schematic designator R40)
R40B "200" RESC1005X40N 62.764,63.438 r0 top (schematic designator R40)
R40C "200" RESC1005X40N 62.764,40.938 r0 top (schematic designator R40)
R40D "200" RESC1005X40N 62.764,18.438 r0 top (schematic designator R40)
R41A "200" RESC1005X40N 62.764,86.838 r0 top (schematic designator R41)
R41B "200" RESC1005X40N 62.764,64.338 r0 top (schematic designator R41)
R41C "200" RESC1005X40N 62.764,41.838 r0 top (schematic designator R41)
R41D "200" RESC1005X40N 62.764,19.338 r0 top (schematic designator R41)
R42 "200" RESC1005X40N 105.244,40.188 r0 bottom
R43 "470" RESC1005X40N 3.974,41.249 r180 top
R44 "470" RESC1005X40N 5.319,36.483 r0 top
R45 "0" RESC1005X40N 143.819,58.438 r180 top
R46 "0" RESC1005X40N 9.944,8.963 r180 top
R47 "49R9" RESC1005X40N 112.601,30.144 r180 top
R48A "0" RESC1005X40N 49.561,72.163 r180 top (schematic designator R48)
R48B "0" RESC1005X40N 49.561,55.163 r180 top (schematic designator R48)
R48C "0" RESC1005X40N 49.561,38.163 r180 top (schematic designator R48)
R48D "0" RESC1005X40N 49.561,21.163 r180 top (schematic designator R48)
R49A "0" RESC1005X40N 46.461,72.163 r180 top (schematic designator R49)
R49B "0" RESC1005X40N 46.461,55.163 r180 top (schematic designator R49)
R49C "0" RESC1005X40N 46.461,38.163 r180 top (schematic designator R49)
R49D "0" RESC1005X40N 46.461,21.163 r180 top (schematic designator R49)
R50A "0" RESC1005X40N 43.245,72.163 r180 top (schematic designator R50)
R50B "0" RESC1005X40N 43.245,55.163 r180 top (schematic designator R50)
R50C "0" RESC1005X40N 43.245,38.163 r180 top (schematic designator R50)
R50D "0" RESC1005X40N 43.245,21.163 r180 top (schematic designator R50)
R51A "0" RESC1005X40N 40.394,72.138 r0 top (schematic designator R51)
R51B "0" RESC1005X40N 40.394,55.138 r0 top (schematic designator R51)
R51C "0" RESC1005X40N 40.394,38.138 r0 top (schematic designator R51)
R51D "0" RESC1005X40N 40.394,21.138 r0 top (schematic designator R51)
R52 "49R9" RESC1005X40N 112.944,37.788 r180 top
R53 "5k6" RESC1608X55N 122.83,3.163 r180 bottom
R54A "49R9" RESC1005X40N 55.919,80.405 r270 top (schematic designator R54)
R54B "49R9" RESC1005X40N 55.931,63.398 r270 top (schematic designator R54)
R54C "49R9" RESC1005X40N 55.931,46.406 r270 top (schematic designator R54)
R54D "49R9" RESC1005X40N 55.969,29.402 r270 top (schematic designator R54)
R55 "24k" RESC1608X55N 146.682,-0.305 r0 top
R56A "0" RESC1005X40N 61.294,81.713 r180 top (schematic designator R56)
R56B "0" RESC1005X40N 61.294,59.213 r180 top (schematic designator R56)
R56C "0" RESC1005X40N 61.294,36.713 r180 top (schematic designator R56)
R56D "0" RESC1005X40N 61.294,14.213 r180 top (schematic designator R56)
R57A "0" RESC1005X40N 45.92,75.415 r180 top (schematic designator R57)
R57B "0" RESC1005X40N 45.92,58.415 r180 top (schematic designator R57)
R57C "0" RESC1005X40N 45.92,41.415 r180 top (schematic designator R57)
R57D "0" RESC1005X40N 45.92,24.415 r180 top (schematic designator R57)
R58A "0" RESC1005X40N 37.944,74.813 r0 top (schematic designator R58)
R58B "0" RESC1005X40N 37.944,57.813 r0 top (schematic designator R58)
R58C "0" RESC1005X40N 37.944,40.813 r0 top (schematic designator R58)
R58D "0" RESC1005X40N 37.944,23.813 r0 top (schematic designator R58)
R59A "0" RESC1005X40N 45.92,76.431 r180 top (schematic designator R59)
R59B "0" RESC1005X40N 45.92,59.431 r180 top (schematic designator R59)
R59C "0" RESC1005X40N 45.92,42.431 r180 top (schematic designator R59)
R59D "0" RESC1005X40N 45.92,25.431 r180 top (schematic designator R59)
R60 "200" RESC1005X40N 105.244,42.688 r0 bottom
R61 "200" RESC1005X40N 105.244,43.588 r0 bottom
R62 "200" RESC1005X40N 105.244,44.888 r0 bottom
R63 "200" RESC1005X40N 105.244,45.788 r0 bottom
R64 "100k" RESC1005X40N 6.131,77.308 r180 top
R65 "100k" RESC1005X40N 6.072,60.866 r180 top
R66 "10k" RESC1005X40N 148.369,68.498 r0 bottom
R67 "10k" RESC1005X40N 148.344,70.663 r0 bottom
R68 "100" RESC1005X40N 144.741,22.205 r270 top
R69 "200" RESC1005X40N 105.244,47.348 r0 bottom
R70 "200" RESC1005X40N 111.644,49.688 r270 bottom
R71 "200" RESC1005X40N 112.644,49.688 r270 bottom
R72 "200" RESC1005X40N 113.544,49.688 r270 bottom
R73 "0" RESC1005X40N 146.687,60.655 r90 top
R74 "100k" RESC1005X40N 6.258,43.739 r180 top
R75 "100k" RESC1005X40N 6.283,26.711 r180 top
R76 "200" RESC1005X40N 116.544,44.888 r180 bottom
R77 "200" RESC1005X40N 105.244,48.248 r0 bottom
R78A "0" RESC1005X40N 61.294,80.788 r180 top (schematic designator R78)
R78B "0" RESC1005X40N 61.294,58.288 r180 top (schematic designator R78)
R78C "0" RESC1005X40N 61.294,35.788 r180 top (schematic designator R78)
R78D "0" RESC1005X40N 61.294,13.288 r180 top (schematic designator R78)
R79A "0" RESC1005X40N 61.294,81.713 r180 bottom (schematic designator R79)
R79B "0" RESC1005X40N 61.294,59.213 r180 bottom (schematic designator R79)
R79C "0" RESC1005X40N 61.294,36.713 r180 bottom (schematic designator R79)
R79D "0" RESC1005X40N 61.294,14.213 r180 bottom (schematic designator R79)
R80 "1k5" RESC1608X55N 106.994,9.938 r90 top
R81 "0" RESC1005X40N 10.944,4.963 r0 top
R82 "24k" RESC1608X55N 147.932,2.445 r90 top
R83 "10k" RESC1005X40N 147.524,84.233 r180 bottom
R84 "24k" RESC1608X55N 146.182,8.195 r0 top
R85 "10k" RESC1005X40N 147.524,86.733 r180 bottom
R86 "10k" RESC1005X40N 147.524,89.233 r180 bottom
R87 "160" RESC1608X55N 147.932,5.695 r270 top
R88A "0" RESC1005X40N 62.764,73.738 r0 top (schematic designator R88)
R88B "0" RESC1005X40N 62.764,51.238 r0 top (schematic designator R88)
R88C "0" RESC1005X40N 62.764,28.738 r0 top (schematic designator R88)
R88D "0" RESC1005X40N 62.764,6.238 r0 top (schematic designator R88)
R89A "Undefined" RESC1005X40N 97.194,72.788 r0 top (schematic designator R89)
R89B "Undefined" RESC1005X40N 97.194,50.288 r0 top (schematic designator R89)
R89C "Undefined" RESC1005X40N 97.194,27.788 r0 top (schematic designator R89)
R89D "Undefined" RESC1005X40N 97.194,5.288 r0 top (schematic designator R89)
R90A "0" RESC1608X55N 62.444,69.541 r90 top (schematic designator R90)
R90B "0" RESC1608X55N 62.444,47.041 r90 top (schematic designator R90)
R90C "0" RESC1608X55N 62.444,24.541 r90 top (schematic designator R90)
R90D "0" RESC1608X55N 62.444,2.041 r90 top (schematic designator R90)
R91A "0" RESC1005X40N 61.294,80.788 r180 bottom (schematic designator R91)
R91B "0" RESC1005X40N 61.294,58.288 r180 bottom (schematic designator R91)
R91C "0" RESC1005X40N 61.294,35.788 r180 bottom (schematic designator R91)
R91D "0" RESC1005X40N 61.294,13.288 r180 bottom (schematic designator R91)
R92A "3k3" RESC1608X55N 60.944,69.541 r270 top (schematic designator R92)
R92B "3k3" RESC1608X55N 60.944,47.041 r270 top (schematic designator R92)
R92C "3k3" RESC1608X55N 60.944,24.541 r270 top (schematic designator R92)
R92D "3k3" RESC1608X55N 60.944,2.041 r270 top (schematic designator R92)
R93A "0" RESC1005X40N 99.264,74.86 r180 bottom (schematic designator R93)
R93B "0" RESC1005X40N 99.264,52.36 r180 bottom (schematic designator R93)
R93C "0" RESC1005X40N 99.264,29.86 r180 bottom (schematic designator R93)
R93D "0" RESC1005X40N 99.264,7.36 r180 bottom (schematic designator R93)
R94A "Undefined" RESC1005X40N 101.364,74.86 r180 bottom (schematic designator R94)
R94B "Undefined" RESC1005X40N 101.364,52.36 r180 bottom (schematic designator R94)
R94C "Undefined" RESC1005X40N 101.364,29.86 r180 bottom (schematic designator R94)
R94D "Undefined" RESC1005X40N 101.364,7.36 r180 bottom (schematic designator R94)
R95 "200" RESC1005X40N 116.544,43.988 r180 bottom
R96A "0" RESC1005X40N 99.771,82.855 r270 bottom (schematic designator R96)
R96B "0" RESC1005X40N 99.771,60.35 r270 bottom (schematic designator R96)
R96C "0" RESC1005X40N 99.771,37.846 r270 bottom (schematic designator R96)
R96D "0" RESC1005X40N 99.771,15.342 r270 bottom (schematic designator R96)
R97A "0" RESC1005X40N 98.869,82.918 r270 bottom (schematic designator R97)
R97B "0" RESC1005X40N 98.857,60.325 r270 bottom (schematic designator R97)
R97C "0" RESC1005X40N 98.857,37.846 r270 bottom (schematic designator R97)
R97D "0" RESC1005X40N 98.857,15.367 r270 bottom (schematic designator R97)
R98A "0" RESC1005X40N 101.575,82.855 r270 bottom (schematic designator R98)
R98B "0" RESC1005X40N 101.575,60.35 r270 bottom (schematic designator R98)
R98C "0" RESC1005X40N 101.575,37.834 r270 bottom (schematic designator R98)
R98D "0" RESC1005X40N 101.575,15.342 r270 bottom (schematic designator R98)
R99A "0" RESC1005X40N 100.66,82.855 r270 bottom (schematic designator R99)
R99B "0" RESC1005X40N 100.686,60.35 r270 bottom (schematic designator R99)
R99C "0" RESC1005X40N 100.686,37.834 r270 bottom (schematic designator R99)
R99D "0" RESC1005X40N 100.66,15.342 r270 bottom (schematic designator R99)
R100 "470" RESC1005X40N 29.51,72.774 r90 top
R101 "200" RESC1005X40N 116.544,43.088 r180 bottom
R102 "200" RESC1005X40N 116.544,42.188 r180 bottom
R103 "0" RESC1608X55N 116.665,37.145 r180 top
R104A "Undefined" RESC1005X40N 99.769,85.018 r270 bottom (schematic designator R104)
R104B "Undefined" RESC1005X40N 99.769,62.518 r270 bottom (schematic designator R104)
R104C "Undefined" RESC1005X40N 99.769,40.018 r270 bottom (schematic designator R104)
R104D "Undefined" RESC1005X40N 99.769,17.518 r270 bottom (schematic designator R104)
R105A "Undefined" RESC1005X40N 98.869,85.018 r270 bottom (schematic designator R105)
R105B "Undefined" RESC1005X40N 98.869,62.518 r270 bottom (schematic designator R105)
R105C "Undefined" RESC1005X40N 98.869,40.018 r270 bottom (schematic designator R105)
R105D "Undefined" RESC1005X40N 98.869,17.518 r270 bottom (schematic designator R105)
R106A "Undefined" RESC1005X40N 101.569,85.018 r270 bottom (schematic designator R106)
R106B "Undefined" RESC1005X40N 101.569,62.518 r270 bottom (schematic designator R106)
R106C "Undefined" RESC1005X40N 101.569,40.018 r270 bottom (schematic designator R106)
R106D "Undefined" RESC1005X40N 101.569,17.518 r270 bottom (schematic designator R106)
R107A "Undefined" RESC1005X40N 100.669,85.018 r270 bottom (schematic designator R107)
R107B "Undefined" RESC1005X40N 100.669,62.518 r270 bottom (schematic designator R107)
R107C "Undefined" RESC1005X40N 100.669,40.018 r270 bottom (schematic designator R107)
R107D "Undefined" RESC1005X40N 100.669,17.518 r270 bottom (schematic designator R107)
R108 "10k" RESC1005X40N 115.334,38.363 r180 top
R109 "0" RESC1608X55N 116.665,35.788 r180 top
R110 "10k" RESC1005X40N 115.334,34.671 r180 top
R111 "10k" RESC1005X40N 147.524,81.733 r180 bottom
R112A "10k" RESC1005X35N 62.219,78.813 r180 top (schematic designator R112)
R112B "10k" RESC1005X35N 62.219,56.313 r180 top (schematic designator R112)
R112C "10k" RESC1005X35N 62.219,33.813 r180 top (schematic designator R112)
R112D "10k" RESC1005X35N 62.219,11.313 r180 top (schematic designator R112)
R113A "470" RESC1608X55N 99.694,69.291 r0 bottom (schematic designator R113)
R113B "470" RESC1608X55N 99.694,47.041 r0 bottom (schematic designator R113)
R113C "470" RESC1608X55N 99.194,24.291 r0 bottom (schematic designator R113)
R113D "470" RESC1608X55N 100.944,2.791 r0 bottom (schematic designator R113)
R114 "100" RESC1005X40N 128.098,47.935 r90 bottom
R115 "1k2" RESC1608X55N 107.277,23.464 r270 top
R116 "1k2" RESC1608X55N 142.778,14.926 r180 top
R117 "100" RESC1005X40N 52.086,6.812 r180 top
R118 "4k7" RESC1608X55N 119.994,12.638 r270 top
R119 "1k5" RESC1608X55N 118.494,12.638 r90 top
R120 "10k" RESC1005X40N 108.258,72.918 r270 bottom
R121 "10k" RESC1005X40N 108.144,74.783 r0 bottom
R122 "10k" RESC1005X40N 108.119,76.281 r0 bottom
R123 "0" RESC1005X40N 103.267,73.386 r180 bottom
R124 "0" RESC1005X40N 106.008,73.263 r90 bottom
R125 "0" RESC1005X40N 104.758,73.263 r90 bottom
R126 "0" RESC1005X40N 102.835,81.996 r270 bottom
R127 "0" RESC1005X40N 104.131,82.047 r270 bottom
R128 "0" RESC1005X40N 105.096,82.047 r270 bottom
R129 "1k5" RESC1608X55N 111.044,88.388 r180 top
R130 "1k2" RESC1608X55N 111.044,86.638 r180 top
R131 "6k8" RESC1608X55N 31.824,11.938 r180 top
R132 "2k2" RESC1608X55N 34.824,11.938 r180 top
R133 "68k" RESC1005X40N 31.119,15.348 r180 top
R134 "75k" RESC1608X55N 123.381,4.656 r180 bottom
R135 "2k" RESC1005X40N 32.89,15.348 r180 top
R136 "7k5" RESC1608X55N 126.606,4.614 r180 bottom
R137A "100" RESC3216X65N 21.844,72.365 r90 top (schematic designator R137)
R137B "100" RESC3216X65N 21.869,55.397 r90 top (schematic designator R137)
R137C "100" RESC3216X65N 21.895,38.379 r90 top (schematic designator R137)
R137D "100" RESC3216X65N 21.92,21.387 r90 top (schematic designator R137)
R138A "0" RESC1005X40N 13.394,78.228 r180 top (schematic designator R138)
R138B "0" RESC1005X40N 13.369,61.168 r180 top (schematic designator R138)
R138C "0" RESC1005X40N 13.719,44.138 r180 top (schematic designator R138)
R138D "0" RESC1005X40N 13.423,27.218 r180 top (schematic designator R138)
R139 "2k2" RESC1608X55N 38.149,3.743 r0 top
R140A "0" RESC1608X55N 99.694,70.791 r180 bottom (schematic designator R140)
R140B "0" RESC1608X55N 99.694,48.541 r180 bottom (schematic designator R140)
R140C "0" RESC1608X55N 99.194,25.791 r180 bottom (schematic designator R140)
R140D "0" RESC1608X55N 100.944,4.291 r180 bottom (schematic designator R140)
R141 "0" RESC1608X55N 116.665,47.851 r270 top
R142 "49R9" RESC1005X40N 133.97,82.984 r270 top
R143 "1k2" RESC1608X55N 6.889,2.739 r0 bottom
R144 "49R9" RESC1005X40N 119.413,75.183 r0 top
R145 "49R9" RESC1005X40N 130.166,61.354 r90 top
R146 "49R9" RESC1005X40N 129.082,61.143 r90 top
R147 "470" RESC1005X40N 29.554,21.774 r90 top
R148 "0" RESC1005X40N 136.02,87.345 r90 top
R149 "10k" RESC1005X40N 136.046,85.389 r90 top
R150 "Undefined" RESC1608X55N 124.87,15.837 r0 top
R151 "Undefined" RESC1608X55N 105.87,32.43 r90 top
R152 "470" RESC1005X40N 130.991,62.268 r270 top
R153 "470" RESC1005X40N 127.048,60.239 r0 top
R154 "470" RESC1005X40N 116.734,40.279 r270 top
R155 "470" RESC1005X40N 115.492,49.532 r270 bottom
R156 "0" RESC1608X55N 6.126,84.931 r180 top
R157 "0" RESC1608X55N 6.321,67.787 r180 top
R158 "0" RESC1608X55N 6.491,50.795 r180 top
R159 "0" RESC1608X55N 5.134,90.444 r180 top
R160 "0" RESC1608X55N 6.642,33.802 r180 top
R161 "0" RESC1608X55N 4.448,-1.606 r180 top
R162 "49R9" RESC1005X40N 114.659,32.71 r90 top
R163 "100" RESC1005X40N 112.627,29.23 r0 top
R164 "Undefined" RESC1608X55N 106.709,27.528 r0 top
R165 "470" RESC1005X40N 108.791,31.241 r0 top
R166 "47k" RESC1608X55N 125.944,-1.459 r180 bottom
R167 "470" RESC1005X40N 44.034,10.824 r0 bottom
R168 "470" RESC1005X40N 44.034,12.999 r180 bottom
R169 "470" RESC1005X40N 29.898,55.523 r90 top
R170 "470" RESC1005X40N 29.51,38.748 r90 top
R171 "49R9" RESC1005X40N 142.574,78.598 r180 top
R172 "49R9" RESC1005X40N 142.574,77.601 r180 top
R173 "49R9" RESC1005X40N 142.574,76.637 r180 top
R174 "49R9" RESC1005X40N 142.574,75.687 r180 top
R175 "10k" RESC1005X40N 141.301,63.408 r180 top
R176 "3k3" RESC1608X55N 28.594,12.338 r0 bottom
R177 "68k" RESC1005X40N 28.044,13.838 r180 bottom
R178A "0" RESC1608X55N 22.519,79.38 r180 top (schematic designator R178)
R178B "0" RESC1608X55N 22.594,62.38 r180 top (schematic designator R178)
R178C "0" RESC1608X55N 22.53,45.388 r180 top (schematic designator R178)
R178D "0" RESC1608X55N 22.519,28.38 r180 top (schematic designator R178)
R179 "0" RESC1005X40N 7.769,62.943 r0 top
R180 "0" RESC1005X40N 7.869,79.731 r0 top
R181 "0" RESC1005X40N 8.108,45.793 r0 top
R182 "0" RESC1005X40N 8.011,28.881 r0 top
R183 "10k" RESC1005X40N 19.844,2.87 r90 top
R184 "10k" RESC1005X40N 17.194,1.088 r180 top
R185 "47k" RESC1608X55N 13.494,2.153 r180 top
R186 "47k" RESC1608X55N 13.269,4.797 r90 top
R187 "470" RESC1005X40N 20.994,3.313 r270 top
R188 "10k" RESC1005X40N 17.344,5.799 r180 top
R189 "10k" RESC1005X40N 14.619,4.013 r90 top
R190 "0" RESC1005X40N 17.994,9.865 r0 top
R191 "470" RESC1005X40N 14.969,5.963 r0 top
R192A "0" RESC1005X40N 11.469,79.688 r180 top (schematic designator R192)
R192B "0" RESC1005X40N 11.344,62.913 r180 top (schematic designator R192)
R192C "0" RESC1005X40N 11.819,45.788 r180 top (schematic designator R192)
R192D "0" RESC1005X40N 11.794,28.913 r180 top (schematic designator R192)
R193 "10k" RESC1005X40N 34.844,6.122 r180 top
R194 "15k" RESC1005X40N 117.591,1.767 r0 bottom
R195 "1k3" RESC1005X40N 116.194,0.233 r90 bottom
R196 "75k" RESC1005X40N 112.756,-2.297 r90 bottom
R197 "15k" RESC1005X40N 114.187,-1.152 r270 bottom
R198 "0" RESC1005X40N 123.473,6.058 r180 bottom
SW1 "Switch" SW_OMRON_A6S-4102-H 144.244,85.851 r180 top
T1 "BSS84LT1G" SOT95P240X110-3N 52.81,16.225 r270 top
TP0 "Test Point" TPS127 115.824,87.173 r0 top
TP1 "Test Point" TPS127 117.944,87.188 r0 top
TP2 "Test Point" TPS127 120.117,87.198 r0 top
TP3 "Test Point" TPS127 122.301,87.198 r0 top
TP4 "Test Point" TPS127 124.622,87.188 r0 top
TP5 "Test Point" TPS127 153.194,5.961 r0 top
TP6 "Test Point" TPS127 152.604,8.011 r0 top
TP7 "Test Point" TPS127 150.444,5.403 r0 top
TP8 "Test Point" TPS127 150.327,7.372 r0 top
TP10 "Test Point" TPS127 113.794,88.638 r90 top
TP11 "Test Point" TPS127 106.911,66.505 r90 top
TP12 "Test Point" TPS127 109.444,23.888 r90 top
TP13 "Test Point" TPS127 108.407,17.478 r90 top
TP14 "Test Point" TPS127 139.994,14.981 r90 top
TP15 "Test Point" TPS127 108.385,20.041 r90 top
TP16 "Test Point" TPS127 38.044,12.888 r90 top
TP17 "Test Point" TPS127 17.544,12.638 r90 top
TP18 "Test Point" TPS127 126.568,17.707 r90 top
TR1A "1:1" XFMR_MINI-CIRCUITS_CD542 51.269,79.188 r270 top (schematic designator TR1)
TR1B "1:1" XFMR_MINI-CIRCUITS_CD542 51.254,62.225 r270 top (schematic designator TR1)
TR1C "1:1" XFMR_MINI-CIRCUITS_CD542 51.254,45.225 r270 top (schematic designator TR1)
TR1D "1:1" XFMR_MINI-CIRCUITS_CD542 51.254,28.225 r270 top (schematic designator TR1)
TR2 "1:2" XFMR_MINI-CIRCUITS_DB1627 9.944,8.963 r0 top
TR3 "1:2" XFMR_MINI-CIRCUITS_DB1627 146.687,60.905 r270 top
TR4 "1:1" XFMR_MINI-CIRCUITS_AT224-1 7.769,64.213 r270 top
TR5 "1:1" XFMR_MINI-CIRCUITS_AT224-1 7.85,80.988 r270 top
TR6 "1:1" XFMR_MINI-CIRCUITS_AT224-1 8.108,47.063 r270 top
TR7 "1:1" XFMR_MINI-CIRCUITS_AT224-1 8.011,30.138 r270 top
TR8A "1:1" XFMR_MINI-CIRCUITS_AT1521 51.044,79.188 r270 top (schematic designator TR8)
TR8B "1:1" XFMR_MINI-CIRCUITS_AT1521 51.044,62.213 r270 top (schematic designator TR8)
TR8C "1:1" XFMR_MINI-CIRCUITS_AT1521 51.044,45.238 r270 top (schematic designator TR8)
TR8D "1:1" XFMR_MINI-CIRCUITS_AT1521 51.044,28.243 r270 top (schematic designator TR8)
WASHER4 "Custom 3D printed" Keystone_7687 -7.176,80.988 r0 top
WASHER6 "Custom 3D printed" Keystone_7687 -7.058,46.985 r0 top
WASHER7 "Custom 3D printed" Keystone_7687 -6.88,63.977 r0 top
WASHER8 "Custom 3D printed" Keystone_7687 -6.93,13.064 r0 top
WASHER9 "Custom 3D printed" Keystone_7687 -6.658,29.988 r0 top